# Altium PCB synth.PcbDoc (part 2 of 2)
Units mil, origin at the board's own origin, x right, y up, seen from the top; angles counter-clockwise.
Board outline 6645.14 x 4985.02 mil, 4 copper layers (Signal 1, GND, PWR, Signal 2), stack 23.756 mil thick; 99 components, 74 nets, 340 pads, 56 vias.
Unrouted connection lines stored in the file: 198.
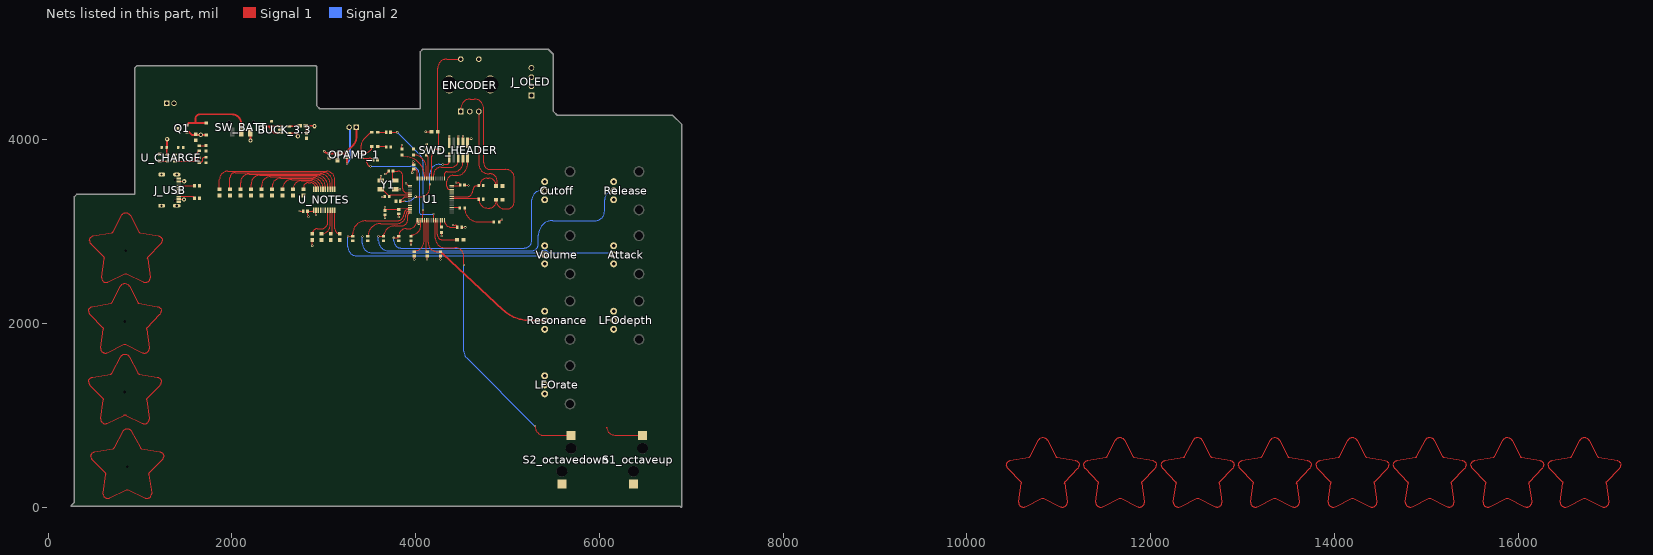
[diagram p4: the nets of this part, all layers, seen from the top]

## Part data (continued)
R_PU: library part CMP-1012-00736-1, "100K 0.1W 1% 0603 (1608 Metric)  SMD", Case-EIA=0603, Case-Metric=1608, Power="0.1 W", Tolerance="1 %", Technology=SMT
R_PULLUP_SCL R_PULLUP_SDA: library part CMP-03412-034306-1, "RT0603 4.7KΩ 0.1W 25 ppm/°C 0.10%", Manufacturer=Yageo, Manufacturer Part Number=RT0603BRD134K7L, Package=RT0603, Power Rating=0.1W, Resistance=4.7KΩ, Temperature="-55°C to +155°C", Temperature Coefficient="25 ppm/°C", Temperature Range High=+155°C, Temperature Range Low=-55°C, Tolerance=0.001, Voltage Rating=75V, Automotive=No, Category=Res, ComponentLink2Description=Datasheet, ComponentLink2URL=http://www.yageo.com/documents/recent/PYu-RT_1-to-0.01_RoHS_L_9.pdf, Composition="Thin Film", Device Class L1="Passive Components", Device Class L2=Resistors, Device Class L3="Chip SMD Resistors", Footprint Url=http://www.yageo.com/exep/pages/download/literatures/PYu-R_Mount_10.pdf, Height=0.55mm, Ipc Land Pattern Name=RESC16080X45, Lead Free=Yes, Octopart=https://octopart.com/rt0603brd134k7l-yageo-91016342, RoHS=TRUE, Series=RT
R_USB_1 R_USB_2: library part CMP-02407-010205-1, "RES SMD 100 OHM 1% 1/8W 0603", Case/Package=0603, Max Operating Temperature=125°C, Min Operating Temperature=-55°C, Resistance=5.1kR, Temperature Coefficient=25ppm/°C, Tolerance=0.1%, Composition="Thin Film", Contact Plating=Tin, Height=450um, Lead Free="Lead Free", Length=1.55mm, Radiation Hardening=No, Width=850um
S1_octaveup S2_octavedown: Package=Package, Check_prices=https://www.snapeda.com/parts/PG151101S11/Kailh/view-part/?ref=eda, MF=Kailh, MP=PG151101S11, SnapEDA_Link=https://www.snapeda.com/parts/PG151101S11/Kailh/view-part/?ref=snap
STATUS_LED1 STATUS_LED?: library part CMP-1674-00011-2, "LED RED CLEAR CHIP SMD", Case Code (Imperial)=0603, Case Code (Metric)=1608, Color=Red, Forward Current=30mA, Forward Voltage=2.4V, Lens Color=Colorless, Max Operating Temperature=85°C, Min Operating Temperature=-55°C, Package Quantity=1, Power Dissipation=75mW, Reverse Voltage=5V, Test Current=20mA, Case/Package=0603, Depth=0.8mm, Dominant Wavelength=631nm, Height=0.8mm, Illumination Color=Red, Lead Free="Lead Free", Length=1.6mm, Lens Style=Diffused, Lens Transparency=Clear, Luminous Intensity=54mcd, Mount="Surface Mount", Number of Elements=1, Number of LEDs=1, Number of Pins=2, Packaging="Tape and Reel", Power Rating=75mW, Radiation Hardening=No, Viewing Angle=130°, Wavelength=639nm, Width=0.8mm
SW_BATT: library part CMP-2000-06501-2, "SWITCH SLIDE SPDT 300MA 6V", Case/Package=100, Contact Current Rating=300mA, Contact Resistance=70mR, Max Operating Temperature=85°C, Max Voltage Rating (DC)=6V, Min Operating Temperature=-40°C, Package Quantity=1, Actuator Length=2mm, Actuator Material=Nylon, Actuator Type=Standard, Contact Material="Copper Alloy", Contact Plating=Silver, Current Rating=300mA, Electrical Life=5000Cycles, Housing Material=Nylon, Illumination Type=Non-Illuminated, Lead Free="Lead Free", Length=9mm, Max Current Rating=300mA, Mount="Surface Mount", Orientation="Right Angle", Packaging="Tape and Reel", Radiation Hardening=No, REACH SVHC="No SVHC", Switch Function=On-On, Switch Travel=2mm, Termination="Gull Wing", Throw Configuration=SPDT, Voltage Rating (DC)=6V
SWD_HEADER: library part CMP-2000-05352-1, "Male Header, Pitch 1.27 mm, 2 x 5 Position, Height 6.12 mm, RoHS, Tube", Color=Black, Manufacturer=Samtec, Package Description="Male Header, Pitch 1.27 mm, 2 x 5 Position, Height 5.97 mm, Tail Length 4.32 mm", Package Reference=FTSH-105-01-L-DV-K, Category=Connectors,Interconnects, Connector Type=Header,Shrouded, Contact Finish=Gold, Contact Finish Thickness=3µin(0.08µm), Contact Mating Length="0.120\"(3.05mm)", Contact Type=MalePin, Datasheet URL=http://suddendocs.samtec.com/prints/ftsh-1xx-xx-xxx-dv-xxx-mkt.pdf, Datasheet Version="Rev. ET, 10/1995", Family=RectangularConnectors-Headers,MalePins, Fastening Type=-, Features=-, Manufacturer URL=http://www.samtec.com/, Mounting Type=SurfaceMount, Number of Positions=10, Number of Positions Loaded=All, Number of Rows=2, Package URL=http://suddendocs.samtec.com/prints/ftsh-1xx-xx-xxx-dv-xxx-footprint.pdf, Packaging=Tube, Pitch="0.050\"(1.27mm)", Row Spacing="0.050\"(1.27mm)", Series=FTSH, Termination=Solder
U1: library part CMP-12105-000007-1, "IC MCU 32BIT 512KB FLASH 64LQFP", Ambient Temperature Range High=+85°C, Ambient Temperature Range Low=-40°C, Frequency=180MHz, Manufacturer=ST, Max Junction Temp=+105°C, Max Supply Voltage=3.6V, Min Supply Voltage=1.7V, Package=LQFP64-5W, Temperature="-40°C to +105°C", Automotive=No, Category=IC, ComponentLink2Description=Datasheet, ComponentLink2URL=https://www.st.com/en/microcontrollers-microprocessors/stm32f446re.html, Core Architecture="ARM Cortex-M4", Data Bus Width=32bits, Device Class L1="Integrated Circuits (ICs)", Device Class L2="Embedded Processors and Controllers", Device Class L3=Microcontrollers, Digikey Description="IC MCU 32BIT 512KB FLASH 64LQFP", Height=1.6mm, Interface=I2C,SPI,UART,USART,CAN,USB,LIN,IrDA,I2S,Other, Ipc Land Pattern Name=QFP50P1200X1200X160-64, Lead Free=Yes, Manufacturer Part Number=STM32F446RET6, Memory Size=512KBytes, Memory Type=FLASH, Mouser Description="ARM Microcontrollers - MCU High-performance and DSP with FP, ARM Cortex-M4 MCU with 512 Kbytes Flash, 180 MHz CPU, Art Accelerator, SDRAM", Number Of A/D Converters=3, Number Of Adc Channels=16, Number Of Cores=1, Number Of I2C Channels=4, Number Of I/Os=50, Number Of Pwm Channels=32, Number Of Spi Channels=4, Number Of Timers/Counters=14, Number Of Uart Channels=6, Number Of Usb Channels=2, Octopart=https://octopart.com/stm32f446ret6-stmicroelectronics-52642920, Ram Size=128KBytes, RoHS=TRUE, Standoff Height=0.05mm, Temperature Range High=+105°C, Temperature Range Low=-40°C
U_CHARGE: library part CMP-0133-00144-2, "IC CONTROLLR LI-ION 4.2V SOT23-5", Case/Package=SOT-23, Max Charge Current=500mA, Max Operating Temperature=85°C, Max Output Voltage=4.232V, Max Supply Voltage=6V, Min Operating Temperature=-40°C, Min Output Voltage=4.168V, Min Supply Voltage=3.75V, Output Voltage=4.2V, Package Quantity=3000, Height=1.3mm, Lead Free="Lead Free", Length=3.1mm, Max Output Current=500mA, Mount="Surface Mount", Number of Cells=1, Number of Pins=5, Output Current=500mA, Packaging="Tape and Reel", REACH SVHC="No SVHC", Width=1.8mm
U_NOTES: library part CMP-06270-000024-1, "IC TOUCH SENSOR 12CH 20TSSOP", Case/Package=TSSOP, Max Operating Temperature=85°C, Min Operating Temperature=-40°C, Package Quantity=4000, Interface=I2C, Number of Channels=12, Number of Pins=20, Packaging="Tape and Reel", RoHS Compliant=Yes, Series=QTouch™
Y1: library part CMP-1688-00002-2, "Crystal 8MHz ±20ppm 18pF SMD-4 5mm x 3.2mm", Case/Package=CSMD, ESR (Equivalent Series Resistance)=200R, Frequency=8MHz, Frequency Stability=50ppm, Frequency Tolerance=20ppm, Load Capacitance=18pF, Max Operating Temperature=70°C, Min Operating Temperature=-20°C, Operating Frequency="8 MHz", Package Quantity=1000, Resistor Type=Ceramic, Depth=3.2mm, Height=0.043inch, Lead Free="Lead Free", Length=5mm, Mount="Surface Mount", Number of Pins=4, Packaging="Tape and Reel", Series=ABM3B, Series Resistance=200R, Termination=SMD/SMT, Tolerance=20ppm, Width=0.126inch

## Via types
v1: diameter 24, hole 12, Signal 1 to Signal 2, 48 vias
v2: diameter 48, hole 24, Signal 1 to Signal 2, 8 vias

## Nets (pads, with @x,y where several pads share a name; then routed paths per layer and width w, separated by ;. In a path a pad name is that pad's centre, name@x,y a point inside that pad or via, vN(x,y) a via of type N, cw(c..) or ccw(c..) an arc to the next point about the centre after c; other vN are vias at no path point)
3.3V: Attack.E BUCK_3.3.4 C_BUCK.1 C_PD_1.1 C_PD_2.1 C_PD_3.1 C_PD_4.1 C_PD_?.1 C_u_notes.1 C_VDD_2.2 Cutoff.E J_OLED.3 L1.2 LFOdepth.E LFOrate.E R_ENC_PU_2.2 R_ENC_PU_3.2 R_ENC_PU_?.2 R_NOTES_PU.2 R_PULLUP_SCL.2 R_PULLUP_SDA.2 Release.E Resonance.E SWD_HEADER.1 U1.1 U1.13 U1.19 U1.32 U1.48 U1.64 U_NOTES.11 Volume.E | length 1835
  Signal 1 w10: v1@2830,3165 cw(c2845.4,3180.4) 2823.62,3180.4 C_u_notes.1@2823.62,3220 2875.78,3220 ccw(c2875.78,3239.89) U_NOTES.11@2889.84,3225.83 ; v1(2875,2845) R_NOTES_PU.2@2875,2905.48 ; v1@3665,3265 v1(3666.1,3263.9) C_VDD_2.2@3666.1,3227.81 ; C_VDD_2.2@3676.87,3240 3797,3240 3798.14,3241.14 3799.44,3241.14 3807.28,3248.99 3895,3254.46 3920,3260.51 U1.13@3938.62,3261.42 ; v1@3890,3530 3890,3528.54 3920.91,3497.64 U1.1@3938.62,3497.64 ; C_PD_4.1@3950,2947.24 3950,2957.01 3951,2959.48 3952.93,2961.41 3955.67,2964.16 ccw(c3952.87,3067.99) 4056.73,3068 ; v1(3963.07,3639.41) 3963.07,3663.07 cw(c3980,3663.07) C_PD_1.1@3980,3680 cw(c3980,3642.64) 4017.36,3642.64 U1.64@4017.36,3576.38 ; 4056.73,3068.05 4056.73,3105 U1.19@4056.73,3123.62 ; v1(4110,4085) R_ENC_PU_3.2@4170.97,4085 ; R_PULLUP_SCL.2@4115,3898.46 ccw(c4115,3903.46) 4120,3903.46 v1(4120,3950) ; U1.32@4312.64,3123.62 ccw(c4391.05,3123.62) 4391.05,3045.21 C_PD_3.1@4453.5,3045.21 ccw(c4428.71,3045.21) 4428.71,3070 v1(4405,3070) ; U1.48@4391.38,3497.64 4477.64,3497.64 ccw(c4477.64,3505) C_PD_2.1@4485,3505 ccw(c4457.59,3505) 4457.59,3532.41 v1(4439.78,3532.41) ; SWD_HEADER.1@4565,3965.12 4565,4000.43 4574.57,4010 v1(4605,4010)
  Signal 1 w20: BUCK_3.3.4@2618.53,4069.88 2695.12,4069.88 cw(c2695.12,4050) v2@2715,4050 ; C_BUCK.1@2810.93,4069.96 2810.93,4144.07 ccw(c2805,4144.07) L1.2@2805,4150 v2@2885,4150
  other v1: 2835,3160 3895,3525
  other v2: 2718.89,4037.06 2898.89,4147.06
A4: A4.1 RU_1.1
A#4: A#4.1 RU_12.1
B4: B4.1 RU_11.1
C4: C4.1 RU_10.1
C#4: C#4.1 RU_9.1
D4: D4.1 RU_8.1
D#4: D#4.1 RU_7.1
E4: E4.1 RU_6.1
ENC_DATA_A: C_ENC_A.2 ENCODER.A R_ENC_PU_?.1 U1.41 | length 2548.8
  Signal 1 w10: U1.41@4391.38,3359.84 4677.91,3359.84 cw(c4677.91,3350) C_ENC_A.2@4687.76,3350 ccw(c4782.76,3350) 4782.76,3255 4805,3255 ccw(c4805,3325.48) 4875.48,3325.48 4875.48,3345 ccw(c4975.48,3345) 4975.48,3245 4990,3245 ccw(c4990,3330) 5075,3330 5075,3580.13 ccw(c4980.13,3580.13) 4980.13,3675 4815,3675 cw(c4815,3750) 4740,3750 4740,4340 ccw(c4640,4340) 4640,4440 4591.57,4440 ccw(c4591.57,4340) 4491.57,4340 ENCODER.A@4491.57,4334.72
ENC_DATA_B: C_ENC_B.2 ENCODER.B R_ENC_PU_2.1 U1.42 | length 1630.1
  Signal 1 w10: U1.42@4391.38,3379.53 4564.9,3379.53 ; 4564.95,3379.53 ccw(c4564.95,3426.02) 4597.9,3393.22 ccw(c4530.77,3460.03) 4625.48,3460.48 cw(c4660,3460.48) 4660,3495 4696.38,3495 cw(c4781.38,3495) 4781.38,3580 4795,3580 cw(c4795,3500) R_ENC_PU_2.1@4875,3500 ; 4688.43,3730 ccw(c4788.43,3730) 4788.43,3630 4800,3630 cw(c4800,3540) 4890,3540 4890,3515 R_ENC_PU_2.1@4875,3500 ; ENCODER.B@4688.43,4334.72 cw(c4688.43,4333.15) 4690,4333.15 4690,4305.21 4690,3730 4690,3715 ; R_ENC_PU_2.1@4875,3495 R_ENC_PU_2.1@4875,3500
ENC_SW: C_ENC_SW.2 ENCODER.1 R_ENC_PU_3.1 U1.56 | length 1556.2
  Signal 1 w10: U1.56@4174.84,3576.38 4174.84,3821.34 cw(c4250,3821.34) C_ENC_SW.2@4250,3896.5 4250,4075 ccw(c4240,4075) R_ENC_PU_3.1@4240,4085 4240,4776.07 cw(c4340,4776.07) 4340,4876.07 ENCODER.1@4490.83,4876.07
F4: F4.1 RU_5.1
F#4: F#4.1 RU_4.1
G4: G4.1 RU_3.1
G#4: G#4.1 RU_2.1
GND: "Charging Done.1" Attack.A bootrsisor.2 BUCK_3.3.2 C_Attack.2 C_BUCK.2 C_bulk.1 C_CAP.2 C_Cutoff.2 C_ENC_A.1 C_ENC_B.1 C_ENC_SW.1 C_LFO_depth.2 C_LFO_rate.2 C_opamp1.1 C_out.2 C_PD_1.2 C_PD_2.2 C_PD_3.2 C_PD_4.2 C_PD_?.2 C_Release.2 C_Reset.2 C_Resonance.2 C_u_notes.2 C_VDD2.1 C_VDD.1 C_VDD?.1 C_VDD_2.1 C_Volume.2 C_Y_1.1 C_Y_2.2 Cutoff.A ENCODER.2 ENCODER.3 ENCODER.4 ENCODER.C J_BATT.1 J_OLED.4 J_USB.A1_B12 J_USB.B1_A12 J_USB.SH1 J_USB.SH2 J_USB.SH3 J_USB.SH4 LFOdepth.A LFOrate.A OPAMP_1.7 R_AMP.1 R_BOOT_PD.2 R_PROG.2 R_PU.2 R_USB_1.1 R_USB_2.2 Release.A Resonance.A S1_octaveup.2 S2_octavedown.2 STATUS_LED1.1 SWD_HEADER.3 SWD_HEADER.5 SWD_HEADER.9 U1.12 U1.18 U1.31 U1.63 U_CHARGE.2 U_NOTES.10 U_NOTES.12 Volume.A Y1.2 Y1.4 | length 993.4
  Signal 1 w10: v1@2735,3220 C_u_notes.2@2776.38,3220 ; v1(2915,3180) 2915.22,3180.22 2915.22,3230.61 U_NOTES.12@2915.43,3230.83 ; Y1.2@3622.52,3554.49 v1@3622.52,3596.81 ; v1(3635,3375) 3660,3375 C_Y_1.1@3665,3380 ; v1(3665,3150) 3665,3179.46 C_VDD_2.1@3666.1,3180.56 ; v1(3670,3625) 3672.68,3627.68 3678.32,3627.68 3705.68,3655.04 C_Y_2.2@3705.68,3657.99 ; Y1.4@3780,3460 v1(3830,3460) ; v1(3815,3156.92) C_PD_?.2@3815,3191.38 ; bootrsisor.2@3850,3896.93 v1(3850,3940) ; C_PD_4.2@3950,2895 3950.48,2894.52 v1(3950.48,2854.77) ; v1(3974.35,3761.42) 3974.35,3737.01 C_PD_1.2@3980,3727.24 ; v1(3985,2695) C_LFO_rate.2@3985,2732.76 ; v1(4034.73,3085) 4036.14,3086.41 4036.14,3105 U1.18@4037.05,3123.62 ; v1(4125,2695) C_LFO_depth.2@4125,2732.76 ; v1(4270,2695) C_Resonance.2@4270,2732.76 ; C_CAP.2@4280,2990.47 4283.9,2986.58 v1(4283.9,2951.95) ; SWD_HEADER.9@4365,3965.12 v1(4365,4040) ; SWD_HEADER.5@4465,3965.12 v1(4465,4040) ; C_PD_3.2@4500.75,3045.21 v1(4539.79,3045.21) ; SWD_HEADER.3@4515,3965.12 v1(4515,4040) ; C_PD_2.2@4532.24,3505 4535.86,3501.38 v1(4574.63,3501.38) ; STATUS_LED1.1@4909.53,3105 4932.06,3127.53 4937.11,3127.53 v1(4939.79,3130.21)
  other v1: 2735.18,3221.72 3622.07,3599.96
I2C_SCL: J_OLED.2 R_PULLUP_SCL.1 U1.58 U_NOTES.16 | length 269.7
  Signal 1 w10: R_PULLUP_SCL.1@4110,3831.54 cw(c4110,3806.06) 4135.47,3806.06 U1.58@4135.47,3576.38
I2C_SDA: J_OLED.1 R_PULLUP_SDA.1 U1.59 U_NOTES.13 | length 335.5
  Signal 1 w10: R_PULLUP_SDA.1@3975,3831.54 3985.75,3831.12 cw(c3975,3690.75) 4115.79,3690.75 U1.59@4115.79,3576.38
NetAttack_S: Attack.S C_Attack.1 U1.15 | length 3495.8
  Signal 1 w10: C_Attack.1@3480,2947.24 3480.35,2957.01 cw(c3617.76,2947.24) 3617.76,3085 3795,3085 ccw(c3795,3185) 3895,3185 3895,3190 cw(c3927.05,3190) 3927.05,3222.05 U1.15@3938.62,3222.05
  Signal 2 w10: v1(3420,2945) 3420,2869.2 ccw(c3520,2869.2) 3520,2769.2 5356.66,2769.2 ccw(c5356.62,2779.2) 5364.84,2773.51 cw(c5404.41,2746.34) 5443.99,2773.5 ccw(c5452.2,2779.2) 5452.15,2769.2 Attack.S@6148.54,2769.2
Netbootrsisor_1: bootrsisor.1 U1.60 | length 392.1
  Signal 1 w10: bootrsisor.1@3854.25,3830.96 3860.75,3824.07 3862.38,3822.34 3862.48,3822.24 ccw(c3869.55,3829.31) 3862.52,3822.2 3915.68,3812.33 cw(c3875.02,3593.42) 4097.67,3593.42 4097.01,3586.21 U1.60@4096.1,3576.38
NetBUCK_3.3_5: BUCK_3.3.5 L1.1 | length 135.2
  Signal 1 w20: BUCK_3.3.5@2618.53,4144.69 2729.69,4144.69 ccw(c2729.69,4160) L1.1@2745,4160
NetC_CAP_1: C_CAP.1 U1.30 | length 77.9
  Signal 1 w10: U1.30@4273.27,3123.62 4273.27,3056.26 ccw(c4280,3056.26) C_CAP.1@4280,3049.53
NetC_Cutoff_1: C_Cutoff.1 Cutoff.S U1.17 | length 2628.6
  Signal 1 w10: v1(3762.46,2930.97) 3798.73,2930.97 ccw(c3798.73,2947.24) C_Cutoff.1@3815,2947.24 3815.58,2957.01 cw(c3897.76,2947.24) 3897.76,3030 3923.74,3030 ccw(c3923.74,3123.62) U1.17@4017.36,3123.62
  Signal 2 w10: v1(3762.46,2930.97) 3762.46,2897.54 ccw(c3840,2897.54) 3840,2820 5179.55,2820 ccw(c5179.55,2905.45) 5265,2905.45 5265,3343.66 cw(c5365,3343.66) 5365,3443.66 Cutoff.S@5404.41,3443.66
NetC_in_1: C_in.1 U1.20 | length 1141
  Signal 1 w10: C_in.1@3727.24,4080 v1(3800,4080) ; U1.20@4076.42,3123.62 4077.32,3142.24 v1(4080.24,3232.6)
  Signal 2 w10: v1(3800,4080) 4050.71,3829.29 cw(c3980,3758.58) 4080,3758.58 4080,3232.85 v1(4080.24,3232.6)
NetC_in_2: C_in.2 R_OPAMP_1.1 | length 91.5
  Signal 1 w10: R_OPAMP_1.1@3588.46,4080 C_in.2@3680,4080
NetC_LFO_depth_1: C_LFO_depth.1 LFOdepth.S U1.22 | length 348.9
  Signal 1 w10: U1.22@4115.79,3123.62 4115.79,2789.21 ccw(c4125,2789.21) C_LFO_depth.1@4125,2780
NetC_LFO_rate_1: C_LFO_rate.1 LFOrate.S U1.21 | length 411.3
  Signal 1 w10: C_LFO_rate.1@3985,2780 3990.19,2789.76 3992.08,2790.24 ccw(c3985,2896.39) 4091.39,2896.36 cw(c4101.39,2896.3) 4091.39,2896.48 4095.2,3105 U1.21@4096.1,3123.62
  Signal 1 w15: C_LFO_rate.1@3985,2780 C_LFO_rate.1@3993.17,2772.74
NetC_out_1: C_out.1 R_OPAMP_?.1 | length 94.2
  Signal 1 w10: R_OPAMP_?.1@3588.46,3925 3669.31,3925 cw(c3669.31,3907.93) C_out.1@3681.38,3920
NetC_Release_1: C_Release.1 Release.S U1.16 | length 3643.2
  Signal 1 w10: v1(3595.29,2947.81) ccw(c3596.97,2947.81) 3596.97,2946.12 3648.88,2946.12 C_Release.1@3650,2947.24 3652.34,2957.01 3655.17,2968.81 cw(c3770.79,2941.1) 3659.17,2982.06 cw(c3770.79,2941.1) 3770.79,3060 3840,3060 ccw(c3840,3135) 3915,3135 3915,3178.74 cw(c3938.62,3178.74) U1.16@3938.62,3202.36
  Signal 2 w10: v1(3595.29,2947.81) 3595.29,2900 ccw(c3705.29,2900) 3705.29,2790 5260,2790 ccw(c5260,2865) 5335,2865 5335,2960 cw(c5493.08,2960) 5493.08,3118.08 5955.33,3118.08 ccw(c5955.33,3218.08) 6055.33,3218.08 6055.33,3343.99 cw(c6155,3343.99) Release.S@6155,3443.66
NetC_Reset_1: C_Reset.1 SWD_HEADER.10 U1.7 | length 1000.6
  Signal 1 w10: C_Reset.1@3833.62,3330 3876.03,3330 v1(3877.38,3331.35) ; C_Reset.1@3833.62,3332.95 3880.2,3379.53 U1.7@3938.62,3379.53 ; v1(4000.15,3378.89) 4055,3378.89 ccw(c4055,3478.89) 4155,3478.89 v1(4155,3515) ; v1(4295,3730) 4340.27,3731.58 4340.43,3731.58 ccw(c4340.43,3757.79) 4366.49,3754.96 SWD_HEADER.10@4365,3804.88
  Signal 2 w10: v1(3877.38,3331.35) 3911.18,3331.35 ccw(c3911.18,3431.35) 3981.89,3360.64 v1(4000.15,3378.89) ; v1(4155,3515) 4155,3630 cw(c4255,3630) 4255,3730 v1(4295,3730)
NetC_Resonance_1: C_Resonance.1 Resonance.S U1.23 | length 1848.4
  Signal 1 w10: U1.23@4135.47,3123.62 4135.47,2880 ccw(c4235.47,2880) 4235.47,2780 C_Resonance.1@4270,2780
  Signal 1 w15: C_Resonance.1@4270,2780 4277.84,2772.74 4291.55,2760.02 4292.89,2760.02 4300.22,2752.7 4300.22,2752.16 4302.33,2750.04 4302.53,2749.84 4949.77,2149.8 ccw(c5230.15,2430.18) 4949.97,2149.61 ccw(c5230.15,2430.18) 5230.21,2033.66 Resonance.S@5404.41,2033.66
NetC_VDD?_2: C_VDD?.2 J_BATT.2 Q1.3 U_CHARGE.3
NetC_VDD_2: C_VDD.2 D1.2 J_USB.A4_B9 J_USB.B4_A9 Q1.1 R_PU.1 STATUS_LED?.2 U_CHARGE.4 | length 525.9
  Signal 1 w10: J_USB.B4_A9@1422.2,3355.43 1425.92,3351.71 1474.87,3351.71 v2(1478.59,3347.99) ; J_USB.A4_B9@1422.2,3544.41 1422.5,3544.7 1479.7,3544.7 v2(1480,3545)
  Signal 1 w20: v2(1295,4005) 1292.5,4002.5 1292.5,3917.14 1290.36,3915 1290.36,3838.07 1290.9,3837.52 U_CHARGE.4@1298.02,3837.52 ; Q1.1@1509.49,4083.43 1511.5,4081.42 1535.54,4081.42 1569.68,4047.27 ; 1569.68,4049.24 1571.02,4050.58 1659.03,4050.58 v2(1660.37,4051.91) ; v2@1661.14,4051.14 1661.33,4050.96 1724.39,4050.96 D1.2@1725.34,4050
NetC_Volume_1: C_Volume.1 U1.14 Volume.S | length 3170.3
  Signal 1 w10: v1(3262.9,2946.12) cw(c3264.02,2946.12) 3264.02,2947.24 C_Volume.1@3315,2947.24 3315,2972.54 cw(c3457.46,2972.54) 3457.46,3115 3795,3115 ccw(c3795,3195) 3875,3195 cw(c3921.73,3195) 3921.73,3241.73 U1.14@3938.62,3241.73
  Signal 2 w10: v1(3262.9,2946.12) 3262.9,2832.61 ccw(c3360.51,2832.61) 3360.51,2735 5388.93,2735 ccw(c5388.93,2745) 5395.98,2737.91 Volume.S@5404.41,2746.34
NetC_Y_1_2: C_Y_1.2 U1.6 Y1.3 | length 346.8
  Signal 1 w10: Y1.3@3636.3,3458.9 3712.24,3382.95 C_Y_1.2@3712.24,3380 3722.01,3389.76 3722.01,3393.35 3727.87,3399.21 U1.6@3938.62,3399.21
NetC_Y_2_1: C_Y_2.1 U1.5 Y1.1 | length 500.6
  Signal 1 w10: Y1.1@3780,3554.49 cw(c3780,3581.57) 3752.92,3581.57 C_Y_2.1@3752.92,3657.99 3805.53,3657.99 cw(c3805.53,3603.52) 3860,3603.52 3860,3464.95 ccw(c3906.06,3464.95) 3906.06,3418.9 U1.5@3938.62,3418.9
"NetCharging Done_2": "Charging Done.2" R_LED_2.1 | length 111.4
  Signal 1 w10: R_LED_2.1@1645,3747.44 ccw(c1645,3787.44) 1685,3787.44 1685,3795 cw(c1695.51,3795) 1695.51,3805.51 1720,3805.51
NetD1_1: D1.1 Q1.2 SW_BATT.2 | length 955.8
  Signal 1 w20: Q1.2@1509.49,4158.24 1515.24,4163.98 1515.24,4168.28 1526.95,4180 1605,4180 ; D1.1@1731.61,4180 1605,4180 ; SW_BATT.2@2101.14,4081.73 2101.14,4175 ccw(c2001.14,4175) 2001.14,4275 1650,4275 ccw(c1650,4230) 1605,4230 1605,4180
NetJ_SPEAKER_1: J_SPEAKER.1 OPAMP_1.5 | length 298
  Signal 1 w20: OPAMP_1.5@3252.24,3873.39 3325.08,3946.22 ccw(c3254.37,4016.93) 3354.37,4016.93 J_SPEAKER.1@3354.37,4133.35
NetJ_SPEAKER_2: J_SPEAKER.2 OPAMP_1.8 | length 465.7
  Signal 1 w20: OPAMP_1.8@3252.24,3796.61 3252.24,3739.98 ccw(c3254.43,3739.98) v1(3252.88,3738.43)
  Signal 2 w20: v1(3252.88,3738.43) ccw(c3175.35,3815.97) 3285,3815.97 3285,4102.1 3283.1,4104 3283.1,4125.87 J_SPEAKER.2@3275.63,4133.35
NetJ_USB_A5: J_USB.A5 R_USB_1.2 | length 169.6
  Signal 1 w10: J_USB.A5@1422.2,3499.13 cw(c1423.07,3499.13) 1423.07,3500 R_USB_1.2@1591.28,3500
NetJ_USB_B5: J_USB.B5 R_USB_2.1 | length 181
  Signal 1 w10: J_USB.B5@1422.2,3381.02 1423.11,3381.93 1444.58,3381.93 1444.65,3381.99 1573.42,3381.99 1579.28,3376.14 1579.28,3372 R_USB_2.1@1591.28,3360
NetLED_R1_1: LED_R1.1 STATUS_LED1.2 | length 403.5
  Signal 1 w10: LED_R1.1@4532.56,3255 4533.1,3242.28 ccw(c4682.56,3255) 4682.56,3105 STATUS_LED1.2@4850.47,3105
NetLED_R1_2: LED_R1.2 U1.36 | length 88.7
  Signal 1 w10: U1.36@4391.38,3261.42 4471.02,3261.42 LED_R1.2@4477.44,3255
NetOPAMP_1_1: OPAMP_1.1 R_AMP.2 U1.26 | length 1467.6
  Signal 1 w10: OPAMP_1.1@3407.76,3796.61 3470,3796.61 ; v1(3510,3710) cw(c3510,3750) 3470,3750 3470,3796.61 ; R_AMP.2@3535.63,3780 ccw(c3495.52,3739.89) 3495.52,3796.61 3470,3796.61 ; U1.26@4194.53,3123.62 4193.62,3136.9 4195,3138.27 4194.76,3138.51 4194.76,3189.76 v1(4195,3190)
  Signal 2 w10: v1(3510,3710) 3945,3710 cw(c3945,3610) 4045,3610 4045,3195.86 4050.86,3190 v1(4195,3190)
NetOPAMP_1_3: OPAMP_1.3 R_OPAMP_?.2 | length 155.7
  Signal 1 w10: OPAMP_1.3@3407.76,3847.8 3429.33,3849.28 ccw(c3407.76,4004.81) 3518.79,3893.79 3521.54,3896.54 R_OPAMP_?.2@3521.54,3925
NetOPAMP_1_4: OPAMP_1.4 R_OPAMP_1.2 | length 256.1
  Signal 1 w10: OPAMP_1.4@3407.76,3873.39 3407.76,3939.18 ; 3407.76,3939.23 cw(c3500.77,3939.23) 3435,4005 3508.82,4078.82 R_OPAMP_1.2@3521.54,4080
NetR_BOOT_PD_1: R_BOOT_PD.1 U1.28 | length 404.9
  Signal 1 w10: U1.28@4233.9,3123.62 4233.9,2970.11 ccw(c4294.01,2970.11) 4294.01,2910 R_BOOT_PD.1@4450.97,2910
NetR_LED_1_1: R_LED_1.1 STATUS_LED?.1 | length 75.5
  Signal 1 w10: R_LED_1.1@1645,3932.56 cw(c1649.75,3927.81) 1649.75,3934.53 STATUS_LED?.1@1720,3934.53
NetR_LED_1_2: R_LED_1.2 R_LED_2.2 U_CHARGE.1 | length 413.2
  Signal 1 w10: U_CHARGE.1@1381.98,3762.72 1577.88,3762.72 1595,3762.72 ; 1595,3765 1595,3786.02 cw(c1695,3786.02) 1624.29,3856.73 R_LED_1.2@1645,3877.44 ; 1597.28,3765 1595,3762.72 ; R_LED_2.2@1645,3802.56 1641.06,3802.56 1632.28,3793.78 1632.28,3791 1604,3762.72 1595,3762.72
NetR_NOTES_PU_1: R_NOTES_PU.1 U1.62 U_NOTES.17 | length 371.5
  Signal 1 w10: R_NOTES_PU.1@2875,2974.52 cw(c2930.48,2974.52) 2930.48,3030 2975,3030 ccw(c2975,3098.39) 3043.39,3098.39 U_NOTES.17@3043.39,3230.83
NetR_PROG_1: R_PROG.1 U_CHARGE.5 | length 87.5
  Signal 1 w10: R_PROG.1@1215,3770.61 ccw(c1222.89,3770.61) 1222.89,3762.72 U_CHARGE.5@1298.02,3762.72
NetRU_1_2: RU_1.2 U_NOTES.9 | length 230.1
  Signal 1 w10: RU_1.2@2780,3459.03 2780,3480 cw(c2830,3480) 2830,3530 2855.85,3530 cw(c2855.85,3470.34) U_NOTES.9@2914.48,3459.35
NetRU_2_2: RU_2.2 U_NOTES.8 | length 379.5
  Signal 1 w10: RU_2.2@2665,3459.52 cw(c2755.48,3459.52) 2755.48,3550 2850.2,3550 cw(c2850.2,3459.17) U_NOTES.8@2941.02,3459.17
NetRU_3_2: RU_3.2 U_NOTES.7 | length 540.8
  Signal 1 w10: RU_3.2@2551.4,3459.52 cw(c2651.25,3465) 2651.25,3565 2866.61,3565 cw(c2866.61,3465) U_NOTES.7@2966.44,3459.18
NetRU_4_2: RU_4.2 U_NOTES.6 | length 710.3
  Signal 1 w10: RU_4.2@2436.88,3459.52 2436.88,3485 cw(c2531.88,3485) 2531.88,3580 2885.95,3580 cw(c2885.95,3473.74) 2992.2,3473.74 U_NOTES.6@2992.2,3459.17
NetRU_5_2: RU_5.2 U_NOTES.5 | length 880
  Signal 1 w10: RU_5.2@2322.5,3459.52 2322.5,3500 cw(c2417.5,3500) 2417.5,3595 2911.05,3595 cw(c2911.05,3488.26) 3017.8,3488.26 U_NOTES.5@3017.8,3459.17
NetRU_6_2: RU_6.2 U_NOTES.4 | length 1046.4
  Signal 1 w10: RU_6.2@2208.12,3459.52 2208.12,3515 cw(c2303.12,3515) 2303.12,3610 2928.35,3610 cw(c2928.35,3494.96) 3043.39,3494.96 U_NOTES.4@3043.39,3459.17
NetRU_7_2: RU_7.2 U_NOTES.3 | length 1219.2
  Signal 1 w10: RU_7.2@2093.75,3459.52 2093.75,3530 cw(c2188.75,3530) 2188.75,3625 2960.51,3625 cw(c2960.51,3516.53) 3068.98,3516.53 U_NOTES.3@3068.98,3459.17
NetRU_8_2: RU_8.2 U_NOTES.2 | length 1409.5
  Signal 1 w10: RU_8.2@1979.38,3459.52 1979.38,3583.98 cw(c2035.39,3583.98) 2035.39,3640 2994.57,3640 cw(c2994.57,3540) 3094.57,3540 U_NOTES.2@3094.57,3459.17
NetRU_9_2: RU_9.2 U_NOTES.1 | length 1569.2
  Signal 1 w10: RU_9.2@1865,3459.52 1865,3565 cw(c1955,3565) 1955,3655 3030.16,3655 cw(c3030.16,3565) 3120.16,3565 U_NOTES.1@3120.16,3459.17
NetRU_10_2: RU_10.2 U_NOTES.20 | length 287.6
  Signal 1 w10: U_NOTES.20@3120.16,3230.83 3120.16,3029.36 ccw(c3175,3029.36) RU_10.2@3175,2974.52
NetRU_11_2: RU_11.2 U_NOTES.19 | length 267.5
  Signal 1 w10: RU_11.2@3075,2974.52 ccw(c3075,2994.08) 3094.57,2994.08 U_NOTES.19@3094.57,3230.83
NetRU_12_2: RU_12.2 U_NOTES.18 | length 310
  Signal 1 w10: RU_12.2@2975,2974.52 ccw(c2975,3068.49) 3068.98,3068.49 U_NOTES.18@3068.98,3230.83
NetS1_octaveup_1: S1_octaveup.1 U1.57 | length 415.6
  Signal 1 w10: 6075,870 6080,870 ccw(c6165.24,870) 6165.24,784.76 S1_octaveup.1@6441.97,784.76
NetS2_octavedown_1: S2_octavedown.1 U1.27 | length 3229.7
  Signal 1 w10: U1.27@4214.21,3123.62 4214.21,2925 ccw(c4314.21,2925) 4314.21,2825 4425,2825 cw(c4425,2725) 4525,2725 v1(4525,2635) ; v1@5300.02,878 ccw(c5400,879.76) 5400,779.76 S2_octavedown.1@5691.38,779.76
  Signal 2 w10: v1(4525,2635) 4525,1695.66 ccw(c4625,1695.66) 4554.29,1624.95 v1(5297.85,881.39)
NetU1_61: U1.61 U_NOTES.14
SWD_CLK: SWD_HEADER.4 U1.49 | length 375.4
  Signal 1 w10: U1.49@4312.64,3576.38 4311.77,3595 4310.93,3613.28 cw(c4344.39,3616.39) 4344.39,3650 4415,3650 ccw(c4415,3750) 4515,3750 SWD_HEADER.4@4515,3804.88
SWD_IO: SWD_HEADER.2 U1.46 | length 528.5
  Signal 1 w10: U1.46@4391.38,3458.27 4371.73,3458.27 cw(c4371.73,3490) 4340,3490 4340,3545 cw(c4405,3545) 4405,3610 4441.63,3610 ccw(c4441.63,3733.37) 4565,3733.37 SWD_HEADER.2@4565,3804.88
SWD_SWO: SWD_HEADER.6 U1.55 | length 431.4
  Signal 1 w10: U1.55@4195,3576.38 4195,3618.73 cw(c4276.27,3618.73) 4276.27,3700 4390,3700 ccw(c4390,3775) 4465,3775 SWD_HEADER.6@4465,3804.88
USB_DATA_+: J_USB.A6 J_USB.B6 U1.45
USB_DATA_-: J_USB.A7 J_USB.B7 U1.44
V_batt: BUCK_3.3.1 BUCK_3.3.3 C_bulk.2 C_opamp1.2 C_VDD2.2 OPAMP_1.6 SW_BATT.1 | length 689
  Signal 1 w20: SW_BATT.1@2199.57,4081.73 cw(c2199.57,4079.05) 2202.25,4079.05 v2(2202.25,3990.1) ; v2(2350,4140) 2351.82,4141.82 2415,4141.82 ; BUCK_3.3.3@2531.88,4069.88 2486.94,4069.88 cw(c2486.94,4141.82) 2415,4141.82 ; BUCK_3.3.1@2531.88,4144.69 2432.21,4144.69 2429.34,4141.82 2415,4141.82 ; v1(3004.85,3872.82) ccw(c3065.26,3933.22) 3065.26,3847.8 OPAMP_1.6@3252.24,3847.8
pads on no net: Attack.P$1 Attack.P$2 Cutoff.P$1 Cutoff.P$2 J_USB. J_USB.A8 J_USB.B8 LFOdepth.P$1 LFOdepth.P$2 LFOrate.P$1 LFOrate.P$2 OPAMP_1.2 Release.P$1 Release.P$2 Resonance.P$1 Resonance.P$2 S1_octaveup. S2_octavedown. SW_BATT. SW_BATT.3 SWD_HEADER.7 SWD_HEADER.8 U1.2 U1.3 U1.4 U1.8 U1.9 U1.10 U1.11 U1.24 U1.25 U1.29 U1.33 U1.34 U1.35 U1.37 U1.38 U1.39 U1.40 U1.43 U1.47 U1.50 U1.51 U1.52 U1.53 U1.54 U_NOTES.15 Volume.P$1 Volume.P$2

## Polygon pours and split planes (outlines as drawn)
NetC_VDD?_2 on Signal 1 "NETC_VDD?_2_L01_P002" (solid, pour order 2): 1330,3890 1330,3880 ccw(c1395,3880) 1395,3815 ccw(c1395,3865) 1445,3865 1445,4445 ccw(c1440,4445) 1440,4450 1327.56,4450 ccw(c1327.56,4449.15) 1326.72,4449.15 ccw(c1325.87,4449.15) 1325.87,4450 1325,4450
no net on GND (split plane): 5479.92,4918.75 5479.92,4307.08 5480.3,4303.16 5481.45,4299.39 5483.31,4295.91 5485.8,4292.87 5527.87,4250.8 5530.91,4248.31 5534.39,4246.45 5538.16,4245.3 5542.08,4244.92 6788.75,4244.92 6874.92,4158.75 6874.92,30.08 291.3,30.08 300.52,39.31 303.02,42.36 304.88,45.83 306.02,49.6 306.41,53.52 306.41,3372.42 318.9,3384.92 944.99,3384.92 948.91,3385.3 952.68,3386.45 956.15,3388.31 959.2,3390.8 961.69,3393.85 963.55,3397.32 964.7,3401.09 965.08,3405.01 965.08,4773.75 976.25,4784.92 2903.75,4784.92 2904.92,4783.75 2904.92,4367.08 2905.3,4363.16 2906.45,4359.39 2908.31,4355.91 2910.8,4352.87 2942.87,4320.8 2945.91,4318.31 2949.39,4316.45 2953.16,4315.3 2957.08,4314.92 4049.99,4314.92 4053.91,4315.3 4057.68,4316.45 4061.15,4318.31 4064.2,4320.8 4066.69,4323.85 4068.55,4327.32 4069.7,4331.09 4070.08,4335.02 4070.08,4948.75 4086.25,4964.92 5433.75,4964.92
no net on PWR (split plane): 5479.92,4918.75 5479.92,4307.08 5480.3,4303.16 5481.45,4299.39 5483.31,4295.91 5485.8,4292.87 5527.87,4250.8 5530.91,4248.31 5534.39,4246.45 5538.16,4245.3 5542.08,4244.92 6788.75,4244.92 6874.92,4158.75 6874.92,30.08 291.3,30.08 300.52,39.31 303.02,42.36 304.88,45.83 306.02,49.6 306.41,53.52 306.41,3372.42 318.9,3384.92 944.99,3384.92 948.91,3385.3 952.68,3386.45 956.15,3388.31 959.2,3390.8 961.69,3393.85 963.55,3397.32 964.7,3401.09 965.08,3405.01 965.08,4773.75 976.25,4784.92 2903.75,4784.92 2904.92,4783.75 2904.92,4367.08 2905.3,4363.16 2906.45,4359.39 2908.31,4355.91 2910.8,4352.87 2942.87,4320.8 2945.91,4318.31 2949.39,4316.45 2953.16,4315.3 2957.08,4314.92 4049.99,4314.92 4053.91,4315.3 4057.68,4316.45 4061.15,4318.31 4064.2,4320.8 4066.69,4323.85 4068.55,4327.32 4069.7,4331.09 4070.08,4335.02 4070.08,4948.75 4086.25,4964.92 5433.75,4964.92

## Silkscreen, mask and mechanical layers (free items; w line width, h text height)
Top Overlay:
  text "10uH" at 2745,4200 h15
  text "OP AMP" at 3290,3905 h15
  text "all 10k" at 1810,3380 h15 r90
  text "all 10k" at 2812.91,2892.84 h15 r90
  text "Octave Up" at 6215,931.66 h50
  text "Octave Down" at 5395,915 h50
Mechanical 1:
  lines w10: 950,3390 950,4780 970,4800 2910,4800 2920,4790 2920,4365 2955,4330 4060,4330 4055,4335 4055,4955 4080,4980 5440,4980 5495,4925 5495,4305 5540,4260 6795,4260 6890,4165 6890,5 6880,15 254.88,15 291.33,51.44 291.33,3378.67 312.66,3400 950,3400

## Text inside footprints (layer, text, board x,y; h text height)
D1: Top 3D Body "*" at 1695,4172.5 h15 r270; Top Overlay "REFDES" at 1695,4202.5 h15 r270; Top Overlay "RefDes" at 1695,4190 h15 r270